# Allegro board Kartike Sharan_advanced_orcad.brd
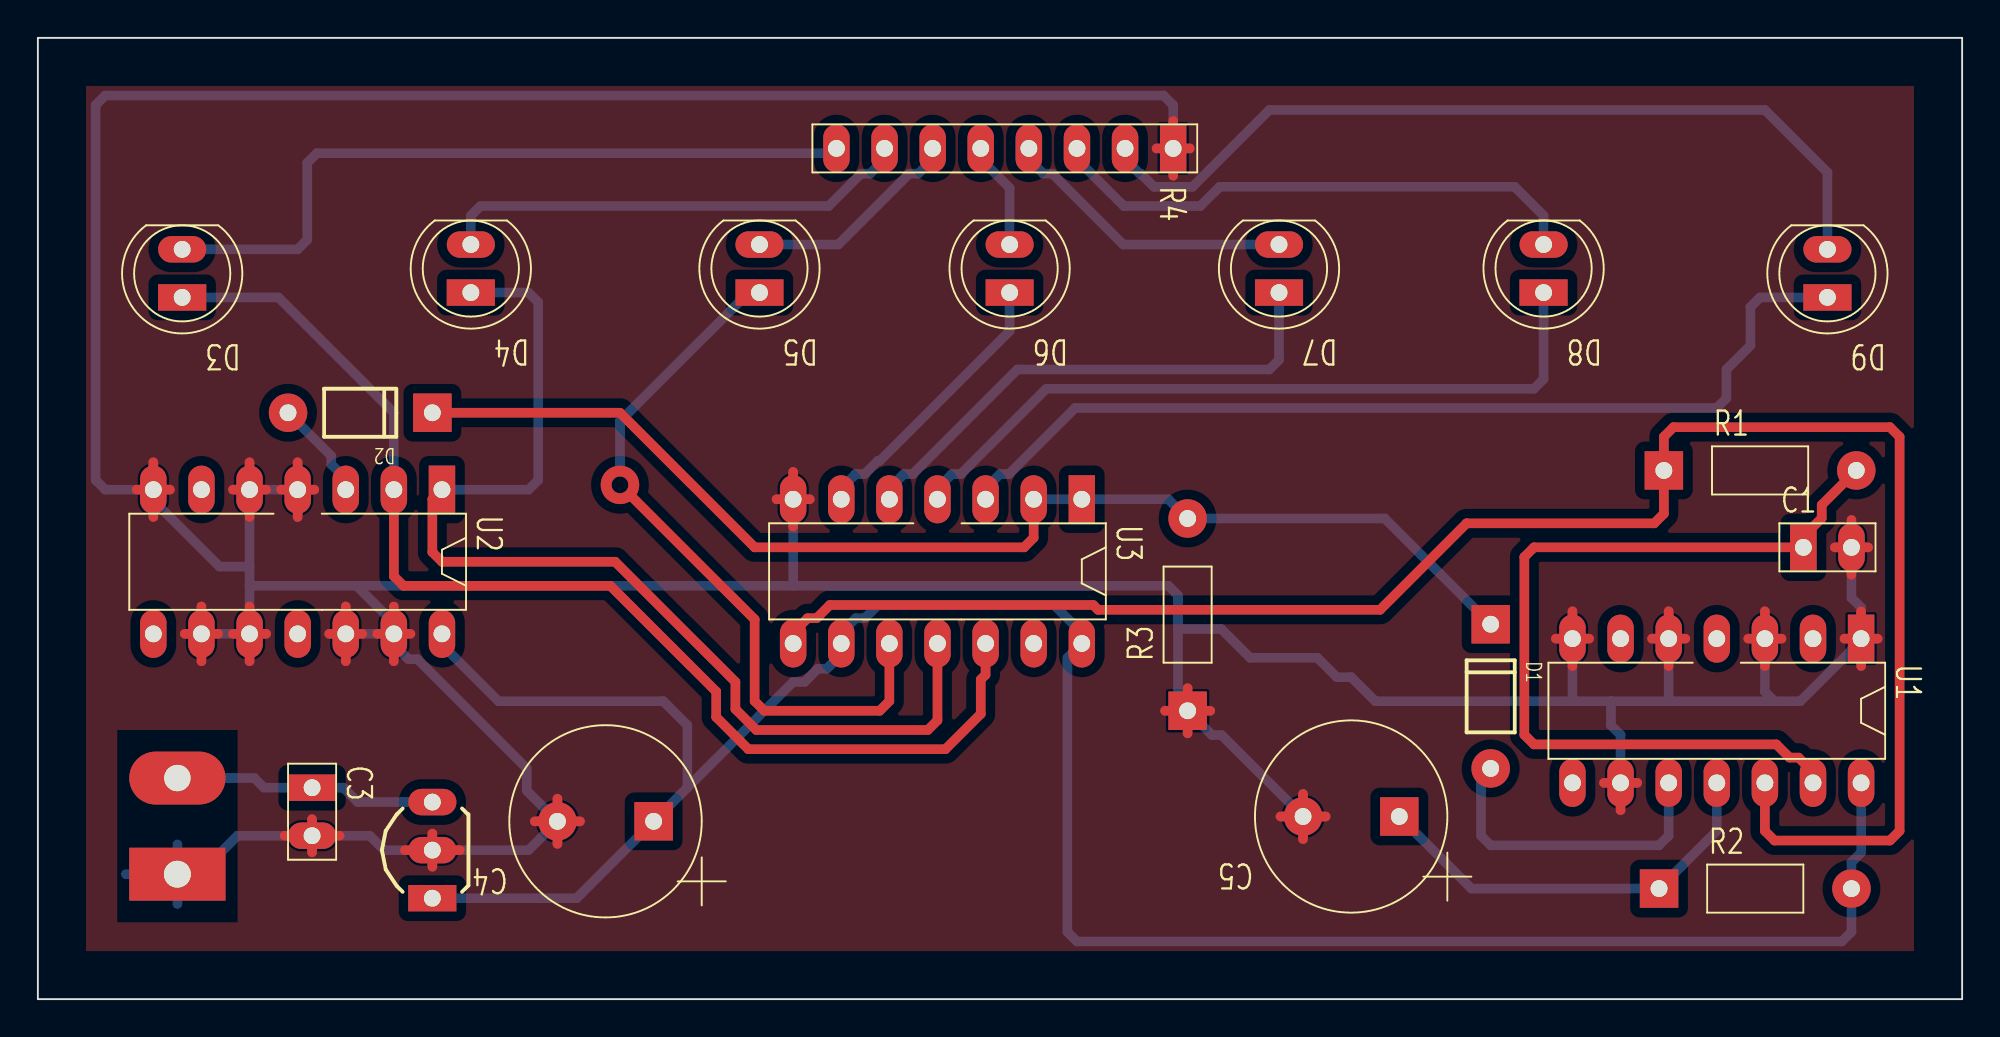
[diagram p0: board, top side]
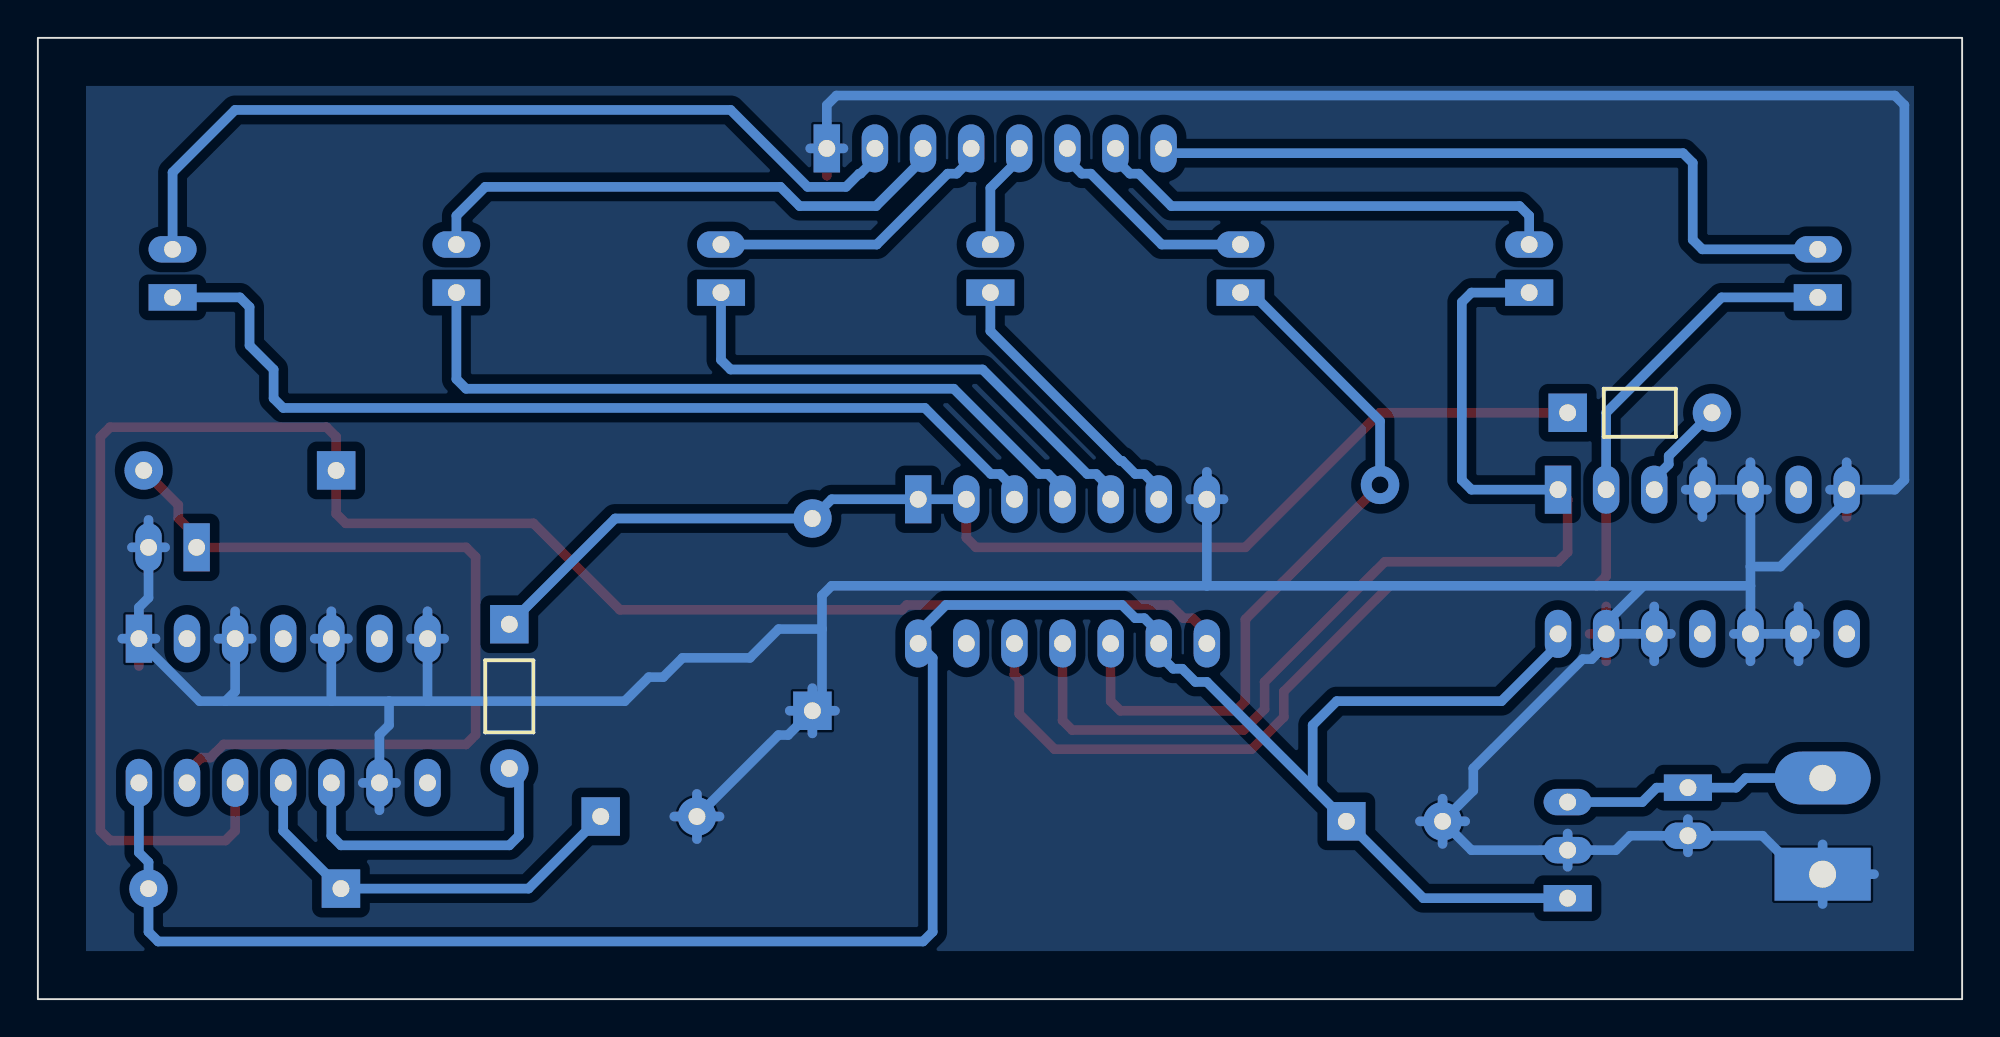
[diagram p1: board, bottom side, seen from below]

Outline 101.6 x 50.8 mm; copper layers: TOP, BOTTOM. Coordinates in mm from the lower left corner of the outline.
Outline path: rectangle 0,0 101.6,50.8

## Design rules (mm)
constraint set DEFAULT: min track width 0.508

## Placement (name value [footprint] x y rotation side)
C1  220n  [GU-RC100]  93.22 23.88 0 top
C3  100n  [GU-RC100]  14.48 11.18 270 top
C4  100u  [GU-CAPCYL200]  32.51 9.4 180 top
C5  4u7  [GU-CAPCYL200]  71.88 9.65 180 top
D1  DIODE  [GU-1N4148]  76.71 19.81 270 top
D2  DIODE  [GU-1N4148]  20.83 30.99 180 top
D3  LED  [GU-LED5MM]  7.62 37.08 180 top
D4  LED  [GU-LED5MM]  22.86 37.34 180 top
D5  LED  [GU-LED5MM]  38.1 37.34 180 top
D6  LED  [GU-LED5MM]  51.31 37.34 180 top
D7  LED  [GU-LED5MM]  65.53 37.34 180 top
D8  LED  [GU-LED5MM]  79.5 37.34 180 top
D9  LED  [GU-LED5MM]  94.49 37.08 180 top
J1  CON2  [GU-TERMINAL2-200]  7.37 6.6 180 top
R1  2M2  [GU-RC400]  85.85 27.94 0 top
R2  1M  [GU-RC400]  85.6 5.84 0 top
R3  R  [GU-RC400]  60.71 15.24 90 top
R4  330R  [GU-SIL8]  59.94 44.96 270 top
U1  74HC14  [GU-DIP14]  96.27 19.05 270 top
U2  74HC86  [GU-DIP14]  21.34 26.92 270 top
U3  74HC164  [GU-DIP14]  55.12 26.42 270 top
U4  LM2931/TO92  [GU-TO92-100]  20.83 5.33 90 top

## Library data of the parts
C1 = CAP NP_3
C3 = CAP NP_4
C4 C5 = CAP POL
D1 D2 = DIODE_2
D3-D9 = LED_4
J1 = CON2: User Part Number: TERMINAL2-200
R1-R3 = R_1
R4 = RESISTOR SIP 8_1
U1 = 74HC14_0
U2 = 74HC86_0
U3 = 74HC164_0
U4 = LM2931/TO92_0

## Footprints (pads in the part's own frame, mm; a bottom-side part is the same pattern mirrored in y, then rotated)
GU-1N4148
  round 2.032 hole 0.889: 1(7.62,0)
  rect 2.032x2.032 hole 0.889: 2(0,0)
GU-CAPCYL200
  rect 2.032x2.032 hole 0.889: 1(0,0)
  round 2.032 hole 0.889: 2(5.08,0)
GU-DIP14
  rect 2.54x1.397 hole 0.889: 1(0,0)
  oval 2.54x1.397 hole 0.889: 2(0,-2.54) 3(0,-5.08) 4(0,-7.62) 5(0,-10.16) 6(0,-12.7) 7(0,-15.24) 8(7.62,-15.24) 9(7.62,-12.7) 10(7.62,-10.16) 11(7.62,-7.62) 12(7.62,-5.08) 13(7.62,-2.54) 14(7.62,0)
GU-LED5MM
  rect 2.54x1.397 hole 0.889: 1(0,0)
  oval 2.54x1.397 hole 0.889: 2(0,-2.54)
GU-RC100
  rect 1.397x2.54 hole 0.889: 1(0,0)
  oval 1.397x2.54 hole 0.889: 2(2.54,0)
GU-RC400
  rect 2.032x2.032 hole 0.889: 1(0,0)
  round 2.032 hole 0.889: 2(10.16,0)
GU-SIL8
  rect 2.54x1.397 hole 0.889: 1(0,0)
  oval 2.54x1.397 hole 0.889: 2(0,-2.54) 3(0,-5.08) 4(0,-7.62) 5(0,-10.16) 6(0,-12.7) 7(0,-15.24) 8(0,-17.78)
GU-TERMINAL2-200
  rect 5.08x2.794 hole 1.422: 1(0,0)
  oval 5.08x2.794 hole 1.397: 2(0,-5.08)
GU-TO92-100
  rect 1.397x2.54 hole 0.889: 1(0,0)
  oval 1.397x2.54 hole 0.889: 2(2.54,0) 3(5.08,0)

## Nets
GND: C1.2 C3.2 C4.2 C5.2 J1.1 R3.1 R4.1 U1.1 U1.3 U1.5 U1.7 U1.9 U2.4 U2.5 U2.7 U2.9 U2.10 U2.12 U2.13 U3.7 U4.2
VCC: C4.1 R2.2 U1.14 U2.14 U3.9 U3.14 U4.1(OUT)
N01246: C3.1 J1.2 U4.3
N01799: C1.1 R1.2 U1.13
N01808: R1.1 U1.12(Y) U3.8
N01948: D3.1 U2.2 U3.12
N01960: D4.1 U2.1 U3.11
N01988: D5.1 U3.10
N01995: D6.1 U3.6
N02002: D7.1 U3.5
N02018: D8.1 U3.4
N02033: D9.1 U3.3
N02048: D3.2(CATHODE) R4.8
N02055: D4.2(CATHODE) R4.7
N02067: D5.2(CATHODE) R4.6
N02079: D6.2(CATHODE) R4.5
N02091: D9.2(CATHODE) R4.2
N02098: D8.2(CATHODE) R4.3
N02110: D7.2(CATHODE) R4.4
N02353: C5.1 R2.1 U1.11
N02370: D1.1 U1.10
N02374: D1.2(K) D2.2(K) R3.2 U3.1 U3.2
N002962: D2.1 U2.3

Pads without a net: U1 2 4 6 8; U2 6 8 11; U3 13

## Via types
v1: diameter 2.032, hole 0.889, TOP to BOTTOM, 1 via

## Routing (per net, layer and track width the routed paths; a pad name or vN(x,y) marks a point on that pad's centre or on a via; arc(x,y) is an arc through that point)
GND: length 427.9
  TOP w0.508: 90.31,19.05 U1.3 ; U1.3 92.06,19.05 ; U1.3 91.19,20.5 ; U1.3 91.19,17.6 ; U2.9 9.51,19.3 ; U2.9 7.76,19.3 ; U2.9 8.64,17.86 ; U2.9 8.64,20.75 ; 95.39,19.05 U1.1 ; U1.1 96.27,20.5 ; U1.1 97.14,19.05 ; U1.1 96.27,17.6 ; R3.1 60.71,16.43 ; R3.1 60.71,14.05 ; R3.1 61.9,15.24 ; R3.1 59.51,15.24 ; 18.8,17.86 U2.13 ; U2.13 17.92,19.3 ; U2.13 18.8,20.75 ; U2.13 19.67,19.3 ; R4.1 60.82,44.96 ; R4.1 59.94,43.51 ; R4.1 59.94,46.41 ; R4.1 59.07,44.96 ; U4.2 22.28,7.87 ; U4.2 20.83,8.75 ; U4.2 20.83,7 ; U4.2 19.38,7.87 ; 15.38,19.3 U2.12 ; U2.12 16.26,17.86 ; U2.12 17.13,19.3 ; U2.12 16.26,20.75 ; 13.03,8.64 C3.2 ; C3.2 14.48,7.76 ; C3.2 15.93,8.64 ; C3.2 14.48,9.51 ; U2.4 14.59,26.92 ; U2.4 13.72,25.48 ; U2.4 13.72,28.37 ; U2.4 12.84,26.92 ; 11.18,25.48 U2.5 ; U2.5 10.3,26.92 ; U2.5 11.18,28.37 ; U2.5 12.05,26.92 ; U1.9 84.44,11.43 ; U1.9 83.57,9.98 ; U1.9 82.69,11.43 ; U1.5 86.98,19.05 ; U1.5 86.11,20.5 ; U1.5 85.23,19.05 ; U1.5 86.11,17.6 ; 81.03,17.6 U1.7 ; U1.7 81.9,19.05 ; U1.7 80.15,19.05 ; U1.7 81.03,20.5 ; U2.7 6.1,28.37 ; U2.7 6.97,26.92 ; U2.7 5.22,26.92 ; U2.7 6.1,25.48 ; 39,26.42 U3.7 ; U3.7 39.88,24.97 ; U3.7 39.88,27.86 ; U3.7 40.75,26.42 ; 11.18,17.86 U2.10 ; U2.10 11.18,20.75 ; U2.10 10.3,19.3 ; U2.10 12.05,19.3 ; C4.2 28.63,9.4 ; C4.2 27.43,10.59 ; C4.2 27.43,8.2 ; C4.2 26.24,9.4 ; C5.2 68,9.65 ; C5.2 65.61,9.65 ; C5.2 66.8,8.46 ; C5.2 66.8,10.85 ; 95.76,22.43 C1.2 ; C1.2 95.76,25.32 ; C1.2 94.88,23.88 ; C1.2 96.63,23.88
  BOTTOM w0.508: C4.2 28.63,9.4 ; C4.2 25.81,11.02 25.81,12.19 20.03,17.97 19.56,17.97 18.8,18.73 U2.13 ; C4.2 27.43,8.2 ; C4.2 26.24,9.4 ; C4.2 25.91,7.87 U4.2 ; C4.2 27.43,10.59 ; 15.38,19.3 U2.12 ; U2.12 U2.13 ; U2.12 16.26,17.86 ; U2.12 16.26,20.75 ; U2.5 11.18,28.37 ; U2.5 U2.4 ; U2.5 11.18,22.86 ; U2.5 10.3,26.92 ; C3.2 17.53,8.64 18.29,7.87 U4.2 ; C3.2 10.54,8.64 8.51,6.6 J1.1 ; C3.2 14.48,7.76 ; C3.2 14.48,9.51 ; U1.3 91.19,20.5 ; U1.3 91.19,16.26 91.69,15.75 ; U1.3 90.31,19.05 ; U1.3 92.06,19.05 ; 4.65,6.6 J1.1 ; J1.1 7.37,5.03 ; J1.1 7.37,8.18 ; 7.76,19.3 U2.9 ; U2.9 8.64,20.75 ; U2.9 8.64,17.86 ; U2.9 U2.10 ; U2.13 18.8,19.88 16.83,21.84 ; U4.2 20.83,7 ; U4.2 20.83,8.75 ; C1.2 95.76,21.21 96.27,20.7 U1.1 ; C1.2 95.76,25.32 ; C1.2 96.63,23.88 ; C1.2 94.88,23.88 ; 60.2,19.56 62.48,19.56 64.01,18.03 67.56,18.03 68.58,17.02 69.34,17.02 70.61,15.75 81.03,15.75 ; 60.2,19.56 60.2,15.75 R3.1 ; 60.2,19.56 60.2,21.34 59.69,21.84 39.88,21.84 ; 11.18,22.86 11.18,21.84 ; 11.18,22.86 9.59,22.86 6.1,26.35 U2.7 ; 11.18,21.84 16.83,21.84 ; 11.18,21.84 U2.10 ; 91.69,15.75 93.06,15.75 96.27,18.95 U1.1 ; 91.69,15.75 86.11,15.75 ; U2.10 12.05,19.3 ; U2.10 11.18,17.86 ; 83.06,15.75 81.03,15.75 ; 83.06,15.75 83.06,14.48 83.57,13.97 U1.9 ; 83.06,15.75 86.11,15.75 ; 81.03,15.75 U1.7 ; U1.9 84.44,11.43 ; U1.9 83.57,9.98 ; U1.9 82.69,11.43 ; U2.4 13.72,28.37 ; U2.4 13.72,25.48 ; U2.4 14.59,26.92 ; 59.07,44.96 R4.1 ; R4.1 59.94,47.24 59.44,47.75 3.56,47.75 3.05,47.24 3.05,27.43 3.56,26.92 U2.7 ; R4.1 60.82,44.96 ; 16.83,21.84 39.88,21.84 ; U1.5 86.11,20.5 ; U1.5 86.98,19.05 ; U1.5 85.23,19.05 ; U1.5 86.11,15.75 ; C5.2 66.8,10.85 ; C5.2 65.61,9.65 ; C5.2 66.8,8.46 ; C5.2 68,9.65 ; C5.2 62.5,13.95 61.99,13.95 R3.1 ; U1.7 81.03,20.5 ; U1.7 81.9,19.05 ; U1.7 80.15,19.05 ; U2.7 6.97,26.92 ; U2.7 6.1,28.37 ; U1.1 95.39,19.05 ; U1.1 97.14,19.05 ; 59.51,15.24 R3.1 ; R3.1 60.71,16.43 ; R3.1 60.71,14.05 ; R3.1 61.9,15.24 ; U3.7 40.75,26.42 ; U3.7 39.88,27.86 ; U3.7 39,26.42 ; U3.7 39.88,21.84
VCC: length 126.6
  BOTTOM w0.508: U4.1 28.45,5.33 C4.1 34.29,11.18 ; 34.29,11.18 39.88,16.76 40.48,16.76 41.18,17.46 41.65,17.46 42.42,18.22 U3.9 42.42,19.37 43.18,20.13 43.66,20.13 44.35,20.83 53.66,20.83 55.12,19.37 U3.14 54.36,18.03 54.36,3.56 54.86,3.05 95.25,3.05 95.76,3.56 R2.2 95.76,7.24 96.27,7.75 U1.14 ; 34.29,11.18 34.29,14.48 33.02,15.75 24.32,15.75 21.34,18.73 U2.14
N01246: length 14
  BOTTOM w0.508: J1.2 11.43,11.68 11.94,11.18 C3.1 16.13,11.18 16.89,10.41 U4.3
N01799: length 46.2
  TOP w0.508: U1.13 93.73,12 92.96,12.77 92.49,12.77 91.79,13.46 78.99,13.46 78.49,13.97 78.49,23.37 78.99,23.88 C1.1 93.22,24.45 94.19,25.42 94.19,26.11 R1.2
N01808: length 97.2
  TOP w0.508: U1.12 91.19,8.89 91.69,8.38 97.79,8.38 98.3,8.89 98.3,29.72 97.79,30.23 86.36,30.23 85.85,29.72 R1.1 85.85,25.65 85.34,25.15 75.44,25.15 70.87,20.57 55.98,20.57 55.72,20.83 41.81,20.83 41.12,20.13 40.64,20.13 39.88,19.37 U3.8
N01948: length 62.5
  TOP w0.508: U2.2 18.8,22.35 19.3,21.84 30.23,21.84 35.81,16.26 35.81,14.91 37.51,13.21 47.92,13.21 49.78,15.07 49.78,16.89 50.04,17.14 U3.12
  BOTTOM w0.508: U2.2 18.8,30.99 12.7,37.08 D3.1
N01960: length 57.6
  TOP w0.508: U3.11 47.5,14.73 46.99,14.22 37.93,14.22 36.83,15.33 36.83,16.76 30.48,23.11 21.34,23.11 20.83,23.62 20.83,26.42 U2.1
  BOTTOM w0.508: D4.1 25.91,37.34 26.42,36.83 26.42,27.43 25.91,26.92 U2.1
N01988: length 38.5
  TOP w0.508: v1(30.73,27.18) 37.85,20.07 37.85,15.75 38.35,15.24 44.45,15.24 44.96,15.75 U3.10
  BOTTOM w0.508: v1(30.73,27.18) 30.73,30.54 37.53,37.34 D5.1
N01995: length 14.9
  BOTTOM w0.508: D6.1 51.31,35.31 44.45,28.45 44.35,28.45 43.66,27.75 43.18,27.75 42.42,26.99 U3.6
N02002: length 27.5
  BOTTOM w0.508: U3.5 44.96,26.99 45.72,27.75 46.2,27.75 51.72,33.27 65.02,33.27 65.53,33.78 D7.1
N02018: length 39.5
  BOTTOM w0.508: U3.4 47.5,26.99 48.26,27.75 48.74,27.75 53.24,32.26 78.99,32.26 79.5,32.77 D8.1
N02033: length 51.3
  BOTTOM w0.508: U3.3 50.04,26.99 50.8,27.75 51.28,27.75 54.77,31.24 88.65,31.24 89.15,31.75 89.15,33.27 90.42,34.54 90.42,36.58 90.93,37.08 D9.1
N02048: length 39.1
  BOTTOM w0.508: R4.8 41.91,44.7 14.73,44.7 14.22,44.2 14.22,40.13 13.72,39.62 D3.2
N02055: length 25.2
  BOTTOM w0.508: D4.2 22.86,41.4 23.37,41.91 41.75,41.91 43.47,43.62 43.94,43.62 44.7,44.39 R4.7
N02067: length 11.6
  BOTTOM w0.508: R4.6 47.24,44.39 46.48,43.62 46.01,43.62 42.26,39.88 D5.2
N02079: length 5.7
  BOTTOM w0.508: R4.5 49.78,44.39 51.31,42.86 D6.2
N02091: length 45.4
  BOTTOM w0.508: R4.2 57.4,44.39 58.17,43.62 58.23,43.62 58.93,42.93 60.96,42.93 65.02,46.99 91.19,46.99 94.49,43.69 D9.2
N02098: length 28.8
  BOTTOM w0.508: R4.3 54.86,44.39 57.34,41.91 61.38,41.91 62.4,42.93 77.98,42.93 79.5,41.4 D8.2
N02110: length 15.6
  BOTTOM w0.508: R4.4 52.32,44.39 53.09,43.62 53.56,43.62 57.31,39.88 D7.2
N02353: length 22.1
  BOTTOM w0.508: C5.1 75.69,5.84 R2.1 88.65,8.89 U1.11
N02370: length 16.9
  BOTTOM w0.508: U1.10 86.11,8.64 85.6,8.13 76.71,8.13 76.2,8.64 76.2,11.68 D1.1
N02374: length 63.8
  TOP w0.508: U3.2 52.58,24.38 52.07,23.88 37.85,23.88 30.73,30.99 D2.2
  BOTTOM w0.508: D1.2 71.12,25.4 R3.2 59.69,26.42 U3.1 U3.2
N002962: length 5.3
  BOTTOM w0.508: D2.1 15.49,28.7 15.49,28.26 16.26,27.5 U2.3

## Copper pours and planes (outline as drawn; the poured copper is in the pictures)
GND on TOP, BOTTOM: 2.54,48.26 99.06,48.26 99.06,2.54 2.54,2.54
